# Altium PCB MiniPC.PcbDoc (part 21 of 24)
Units mm, origin at the board's own origin, x right, y up, seen from the top; angles counter-clockwise.
Board outline 175 x 155 mm, 16 copper layers (1_Top, 2_int1_(gnd), 3_int2_(power), 4_int3_(gnd), 5_int4_(sign), 6_int5_(power), 7_int6_(sign), 8_int7_(power), 9_int8_(gnd), 10_int9_(sign), 11_int10_(gnd), 12_int11_(sign), 13_int12_(gnd), 14_int13_(power), 15_int14_(gnd), 16_Bottom), stack 2.008 mm thick; 1046 components, 837 nets, 6010 pads, 4009 vias.
Unrouted connection lines stored in the file: 564.
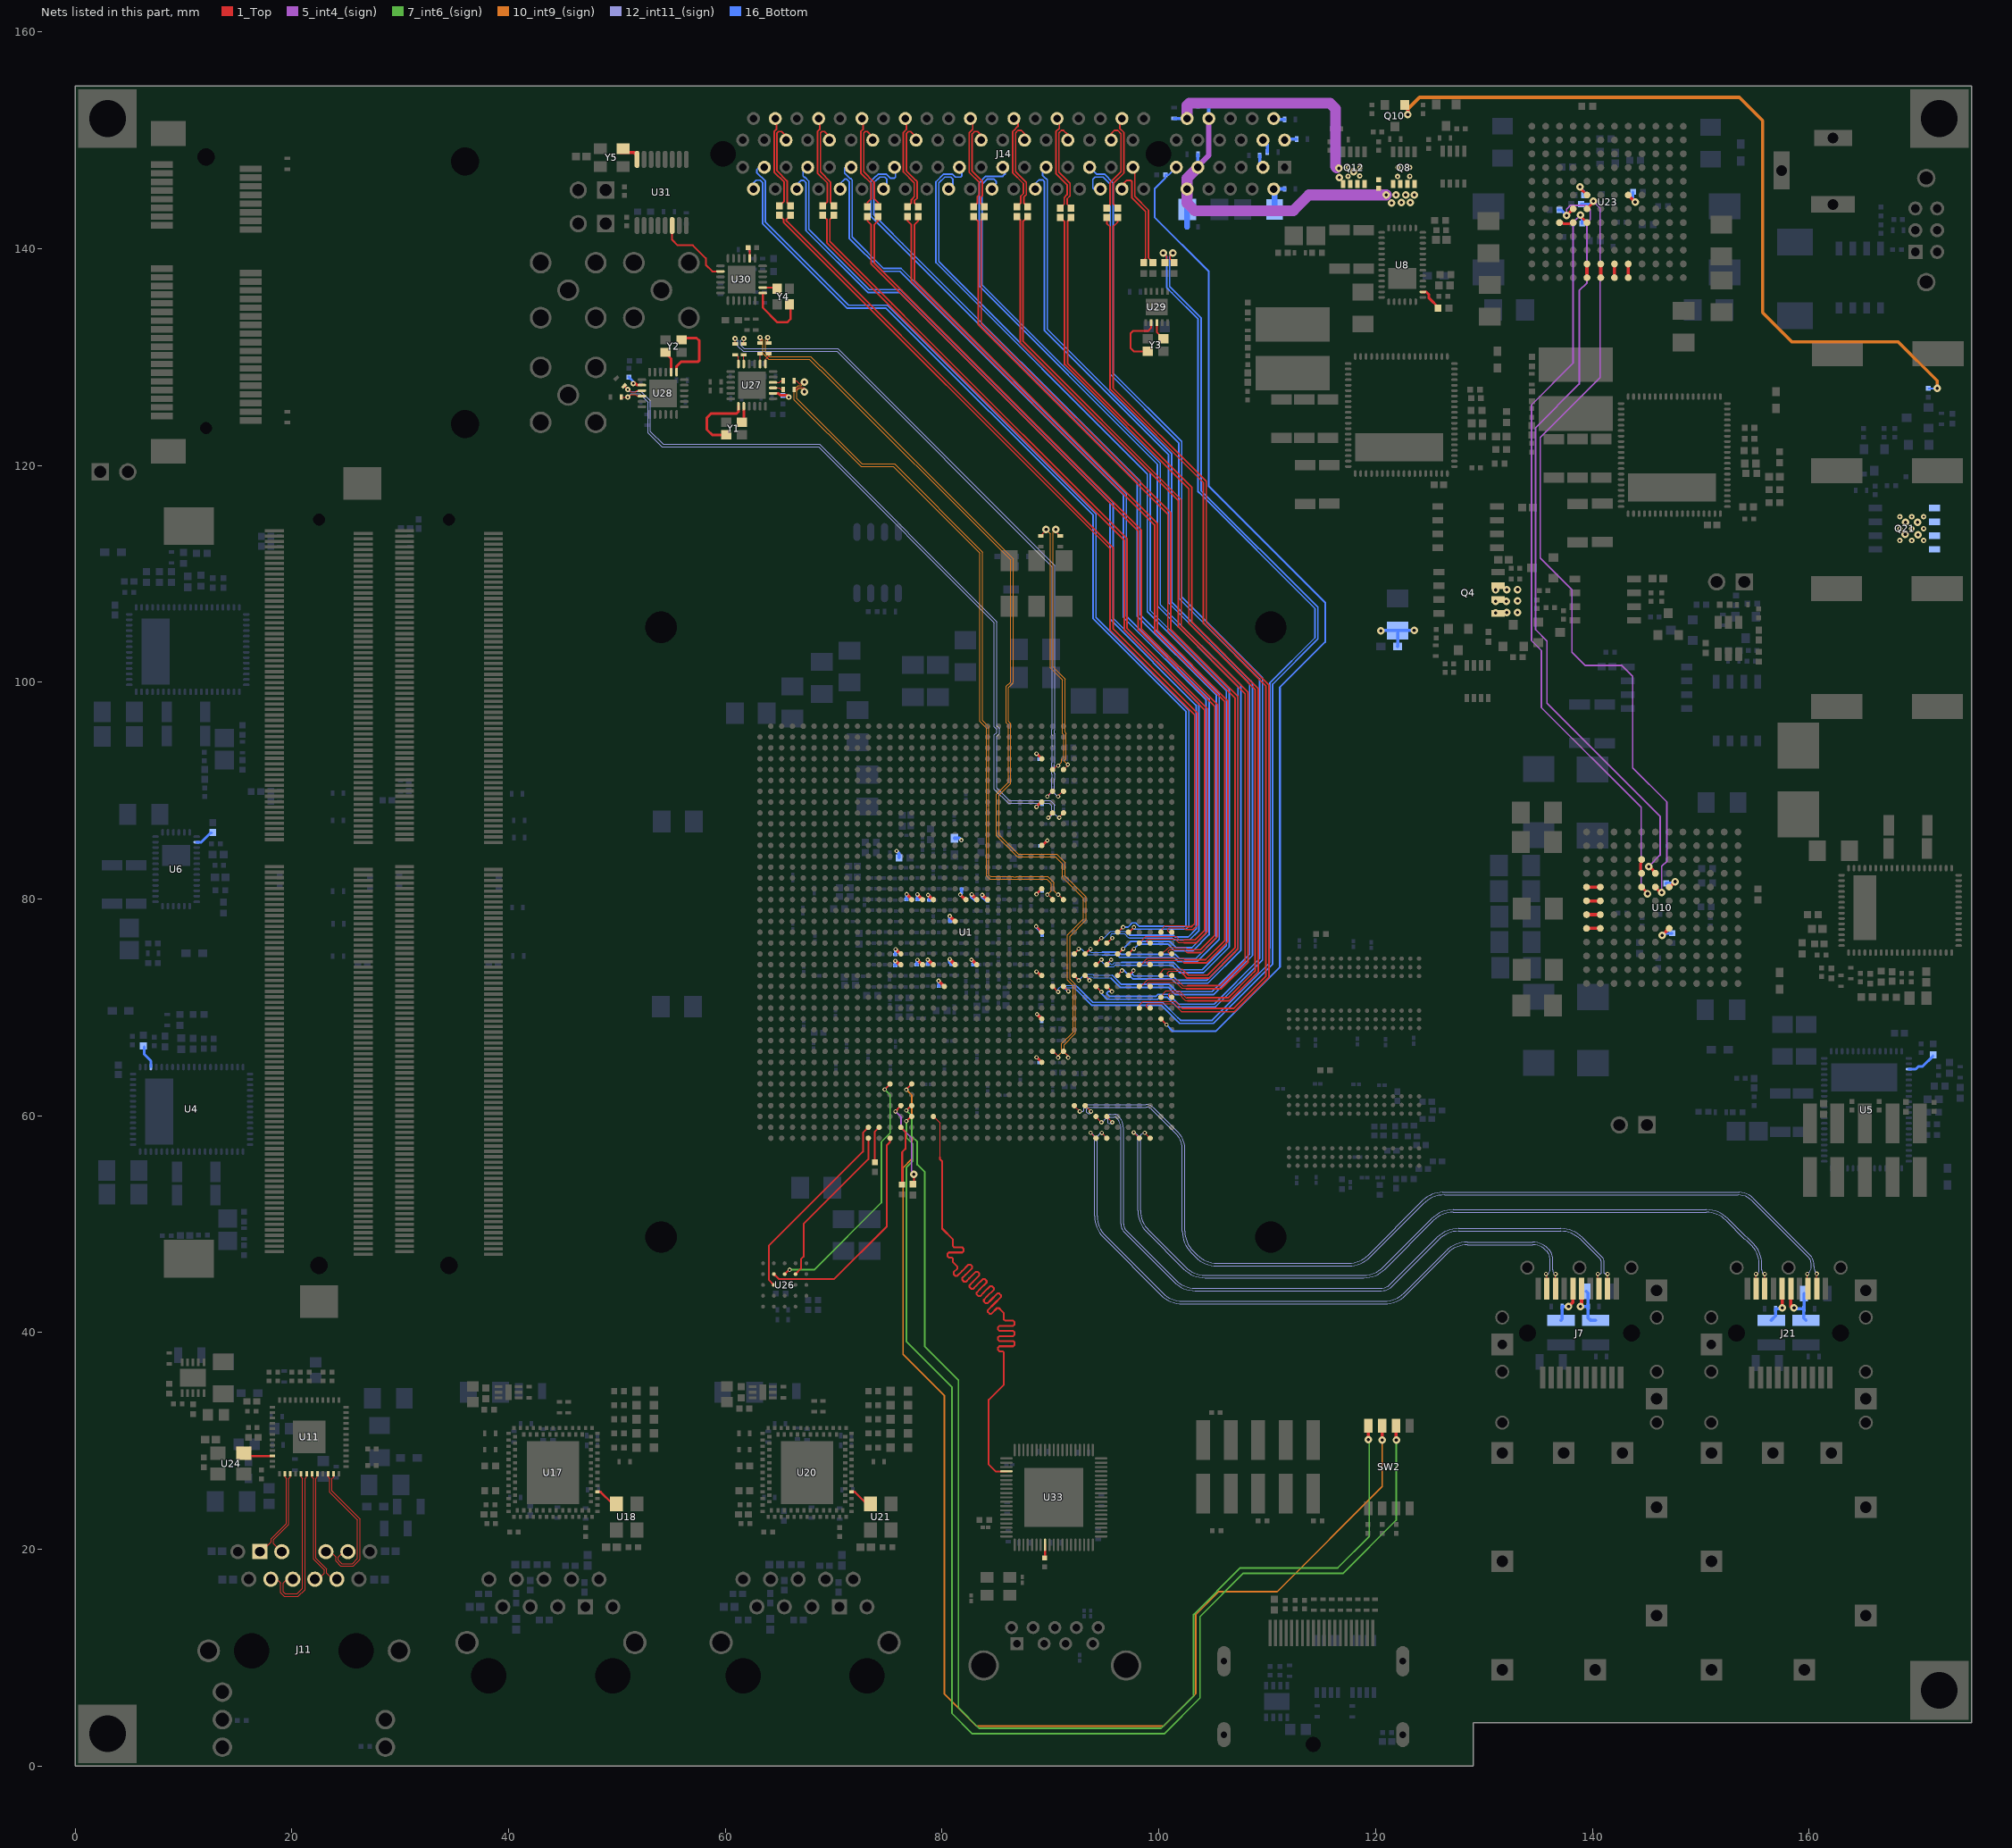
[diagram p33: the nets of this part, all layers, seen from the top]

## Via types
v1: diameter 0.4, hole 0.2, 1_Top to 16_Bottom, tented both sides, 1658 vias
v2: diameter 0.5, hole 0.2, 1_Top to 16_Bottom, tented both sides, 1014 vias
v3: diameter 0.7, hole 0.3, 1_Top to 16_Bottom, tented both sides, 915 vias
v4: diameter 0.6, hole 0.2, 1_Top to 16_Bottom, tented both sides, 278 vias
v5: diameter 0.4, hole 0.2, 1_Top to 16_Bottom, 93 vias
v6: diameter 0.4/0/0/0/0/0/0/0/0/0/0/0/0/0/0/0.4 (per signal layer), hole 0.2, 1_Top to 16_Bottom, tented both sides, 18 vias
v7: diameter 0.4/0/0/0/0/0/0/0/0/0/0/0.4/0.4/0.4/0.4/0.4 (per signal layer), hole 0.2, 1_Top to 16_Bottom, tented both sides, 16 vias
v8: diameter 0.5, hole 0.254, 1_Top to 16_Bottom, tented both sides, 15 vias
v9: diameter 0.5, hole 0.2, 1_Top to 16_Bottom, 2 vias

## Nets (pads, with @x,y where several pads share a name; then routed paths per layer and width w, separated by ;. In a path a pad name is that pad's centre, name@x,y a point inside that pad or via, vN(x,y) a via of type N, cw(c..) or ccw(c..) an arc to the next point about the centre after c; other vN are vias at no path point) (continued)
NetR323_2: R323.2 U1.AT14 | length 8.2
  1_Top w0.17: v1(75.7,60.4) 75.9,60.6 75.9,60.645 U1.AT14@76.194,60.939 ; R323.2@77.3,53.7 77.4,53.8 v3(77.4,54.6)
  5_int4_(sign) w0.15: v1(75.7,60.4) 76.2,59.9 76.2,58.933 77.175,57.958 77.175,54.925 77.4,54.7 v3(77.4,54.6)
NetR324_2: R324.2 U1.AV12 | length 3.5
  1_Top w0.17: R324.2@73.825,55.625 73.769,55.681 73.769,58.514 U1.AV12@74.194,58.939
NetR325_2: R325.2 U1.AV14 | length 5.6
  1_Top w0.17: U1.AV14@76.194,58.939 76.619,58.514 76.619,56.949 76.605,56.949 76.315,56.659 76.315,53.665 R325.2@76.3,53.65
NetR333_2: R333.2 U27.8 | length 2.2
  1_Top w0.25: U27.8@64.4,126.65 64.891,126.65 65.076,126.465 65.685,126.465 v2(65.85,126.3)
  16_Bottom w0.25: R333.2@65.3,126.45 65.7,126.45 v2(65.85,126.3)
NetR334_2: R334.2 U28.8 | length 1.6
  1_Top w0.25: v2(51.5,127.55) 51.6,127.65 51.85,127.4 U28.8@52.3,127.4
  16_Bottom w0.25: R334.2@51.1,128.15 51.5,127.75 v2@51.5,127.65
NetR339_2: R339.2 U30.8 | length 1.1
  1_Top w0.17: R339.2@62.1,140.1 62.245,139.955 U30.8@62.245,139.1
NetR342_1: R342.1 U33.27 | length 1.2
  1_Top w0.2: R342.1@89.5,19.225 U33.27@89.5,20.425
NetSW2_2: SW2.2 U1.AU15 | length 120.6
  1_Top w0.17: v1(76.7,59.5) 77.139,59.939 U1.AU15@77.194,59.939
  1_Top w0.3: SW2.2@121.87,31.42 121.87,30.13 v3(121.9,30.1)
  7_int6_(sign) w0.15: v1(76.7,59.5) 76.7,58 77.3,57.4 77.3,55.829 76.7,55.229 76.7,39.2 80.9,35 80.9,4.9 82.8,3 100.5,3 103.8,6.3 103.8,13.8 107.8,17.8 117,17.8 121.9,22.7 v3(121.9,30.1)
NetSW2_3: SW2.3 U1.AP15 | length 119.3
  1_Top w0.17: v1(76.7,62.4) 76.7,62.445 U1.AP15@77.194,62.939
  1_Top w0.3: v3(120.6,30.1) SW2.3@120.6,31.42
  10_int9_(sign) w0.15: v1(76.7,62.4) 76.733,62.4 77.194,61.939 77.194,55.994 76.4,55.2 76.4,38 80.2,34.2 80.2,6.7 83.2,3.7 100.4,3.7 103.4,6.7 103.4,14 105.5,16.1 110.9,16.1 120.6,25.8 v3(120.6,30.1)
NetSW2_4: SW2.4 U1.AT15 | length 118.4
  1_Top w0.17: v1(76.7,60.5) 77.139,60.939 U1.AT15@77.194,60.939
  1_Top w0.3: v3(119.33,30.13) SW2.4@119.33,31.42
  7_int6_(sign) w0.15: v1(76.7,60.5) 77.2,60 77.2,58.1 77.7,57.6 77.7,55.5 78.4,54.8 78.4,38.7 81.5,35.6 81.5,5.4 83.4,3.5 100.2,3.5 103.2,6.5 103.2,14 107.5,18.3 116.5,18.3 119.4,21.2 119.4,30.06 v3(119.33,30.13)
NetU1_AP13: U1.AP13 U26.D3 | length 23.3
  1_Top w0.17: U26.D3@65.475,45.4 65.875,45.8 v1(65.938,45.8) ; v1(74.7,62.425) 75.194,62.919 U1.AP13@75.194,62.939
  7_int6_(sign) w0.15: v1(65.938,45.8) 68.2,45.8 74.4,52 74.4,57.615 75.2,58.415 75.2,61.894 75.194,61.9 75.194,61.931 v1(74.7,62.425)
NetU1_AV11: U1.AV11 U26.C4 | length 18.5
  1_Top w0.17: U26.C4@64.475,44.4 64,44.875 64,48 72.7,56.7 72.7,58.445 U1.AV11@73.194,58.939
NetU1_AW11: U1.AW11 U26.D2 | length 15.3
  1_Top w0.17: U26.D2@66.475,45.4 66.975,45.9 66.975,46.775 67.225,47.025 67.225,50.025 73.194,55.994 U1.AW11@73.194,57.939
NetU1_AW13: U1.AW13 U26.D4 | length 20.9
  1_Top w0.17: U26.D4@64.475,45.4 64.925,44.95 70.05,44.95 74.9,49.8 74.9,57.3 75.194,57.594 U1.AW13@75.194,57.939
NetU10_C5: U10.C5 U10.D5 | length 1.3
  1_Top w0.25: U10.D5@144.535,82.37 144.535,82.579 144.45,82.664 144.45,83.286 144.535,83.371 U10.C5@144.535,83.64
NetU10_E1: U10.E1 U10.E2 | length 1.3
  1_Top w0.3: U10.E1@139.455,81.1 U10.E2@140.725,81.1
NetU10_F1: U10.F1 U10.F2 | length 1.3
  1_Top w0.3: U10.F1@139.455,79.83 U10.F2@140.725,79.83
NetU10_G1: U10.G1 U10.G2 | length 1.3
  1_Top w0.3: U10.G1@139.455,78.56 U10.G2@140.725,78.56
NetU10_H1: U10.H1 U10.H2 | length 1.3
  1_Top w0.3: U10.H1@139.455,77.29 U10.H2@140.725,77.29
NetU11_46: U11.46 U24.3 | length 2.8
  1_Top w0.2: U24.3@15.7,28.95 15.7,28.75 15.824,28.625 U11.46@18.212,28.625
NetU17_A30: U17.A30 U18.3 | length 2.2
  1_Top w0.2: U17.A30@48.2,25.3 48.5,25.3 49.6,24.2 U18.3@49.9,24.2
NetU20_A30: U20.A30 U21.3 | length 2.2
  1_Top w0.2: U20.A30@71.65,25.3 71.95,25.3 73.05,24.2 U21.3@73.35,24.2
NetU23_C5: U23.C5 U23.D5 | length 1.3
  1_Top w0.25: U23.C5@136.955,142.395 137.224,142.395 137.309,142.31 137.931,142.31 138.016,142.395 U23.D5@138.225,142.395
NetU23_E1: U23.E1 U23.E2 | length 1.3
  1_Top w0.3: U23.E1@139.495,137.315 U23.E2@139.495,138.585
NetU23_F1: U23.F1 U23.F2 | length 1.3
  1_Top w0.3: U23.F1@140.765,137.315 U23.F2@140.765,138.585
NetU23_G1: U23.G1 U23.G2 | length 1.3
  1_Top w0.3: U23.G1@142.035,137.315 U23.G2@142.035,138.585
NetU23_H1: U23.H1 U23.H2 | length 1.3
  1_Top w0.3: U23.H1@143.305,137.315 U23.H2@143.305,138.585
NetU27_1: U27.1 Y1.1 | length 6.4
  1_Top w0.25: Y1.1@59.75,122.8 58.8,122.8 58.3,123.3 58.3,124.4 58.7,124.8 61.05,124.8 61.2,124.95 U27.1@61.2,125.45
NetU27_2: U27.2 Y1.3 | length 1.4
  1_Top w0.25: Y1.3@61.65,124.1 61.7,124.15 U27.2@61.7,125.45
NetU28_1: U28.1 Y2.1 | length 6.3
  1_Top w0.25: U28.1@55.5,128.6 55.5,129.15 55.9,129.55 57.45,129.55 57.6,129.7 57.6,131.5 57.35,131.75 Y2.1@56.1,131.75
NetU28_2: U28.2 Y2.3 | length 2
  1_Top w0.25: Y2.3@54.5,130.35 55,129.85 U28.2@55,128.6
NetU29_2: U29.2 Y3.3 | length 5.7
  1_Top w0.17: Y3.3@98.975,130.525 97.675,130.525 97.4,130.8 97.4,132.2 97.6,132.4 99,132.4 99.3,132.7 U29.2@99.3,133.175
NetU29_3: U29.3 Y3.1 | length 1.8
  1_Top w0.17: U29.3@99.8,133.175 99.8,132.3 Y3.1@100.425,131.675
NetU30_1: U30.1 Y4.1 | length 5.8
  1_Top w0.2: U30.1@63.445,135.9 63.445,134.562 64.807,133.2 65.7,133.2 66,133.5 Y4.1@66,134.7
NetU30_2: U30.2 Y4.3 | length 1.4
  1_Top w0.2: U30.2@63.445,136.4 64.7,136.4 Y4.3@64.8,136.3
NetU30_14: U30.14 U31.14 | length 7.3
  1_Top w0.17: U31.14@55.095,142.126 55.095,140.805 55.6,140.3 57,140.3 58.2,139.1 58.2,138.5 58.8,137.9 U30.14@59.545,137.9
NetU31_8: U31.8 Y5.3 | length 2
  1_Top w0.3: Y5.3@50.321,148.875 51.55,148.875 51.845,148.58 U31.8@51.845,148.226
PCIE_3V3: Q8.5 Q8.6 Q8.7 Q8.8 R18.2
  other v2: 122.025,146.65 123.15,146.675 122.05,147.482 123.15,147.482
PCIE_12V: C500.2 C501.2 C502.2 C503.2 C504.2 C505.2 J14.A2 J14.A3 J14.B1 J14.B2 J14.B3 Q21.5 Q21.6 Q21.7 Q21.8 | length 7.7
  16_Bottom w0.3: C501.2@109.3,148.6 109.3,147.8 J14.A3@109.6,147.5 ; J14.B3@109.6,150 110,149.6 C502.2@110,148.9 ; C500.2@110.6,143.675 C500.2@110.675,143.6 ; J14.A2@110.6,145.5 C504.2@111.6,145.5 ; J14.B2@110.6,152 110.7,151.9 C505.2@111.6,151.9 ; J14.B1@111.6,150 111.7,150.1 C503.2@112.7,150.1
  16_Bottom w0.5: J14.A2@110.6,145.5 110.675,145.425 C500.2@110.675,143.6
  other v2: 168.36,113.065 169.46,113.065 170.56,113.065 168.36,114.165 169.46,114.165 170.56,114.165 168.36,115.265 169.46,115.265 170.56,115.265
  other v3: 170.03,113.59 168.86,113.63 168.89,114.74 170.01,114.74
PCIE_AUX3V3: C483.2 J14.B10 Q12.5 Q12.6 Q12.7 Q12.8 | length 21.9
  5_int4_(sign) w1: J14.B10@102.6,152 102.6,153.2 102.8,153.4 115.8,153.4 116.3,152.9 116.3,147.55 v3@116.4,147.45
  16_Bottom w0.3: C483.2@101.4,152 J14.B10@102.6,152
  other v2: 117.45,146.675 118.525,146.7 117.45,147.482 118.55,147.482
  other v3: 116.65,146.56 117.97,147.1 116.62,147.4
PCIE_DC_3V3: C506.2 C507.2 C508.2 C509.2 J14.A9 J14.A10 J14.B8 R18.1 | length 33.9
  1_Top w0.25: R18.1@120.27,145.55 R18.1@120.37,145.55
  5_int4_(sign) w0.5: J14.A9@103.6,147.5 103.6,147.6 104.6,148.6 J14.B8@104.6,152
  5_int4_(sign) w1: J14.A9@103.6,147.5 102.6,146.5 J14.A10@102.6,145.5 102.6,144.2 103.3,143.5 112.4,143.5 113.85,144.95 v3(120.97,144.95)
  16_Bottom w0.3: J14.A9@103.6,147.5 C507.2@103.6,148.7 ; J14.B8@104.6,152 C506.2@104.6,153.2
  16_Bottom w0.5: C508.2@102.6,142 102.6,143.575 C509.2@102.625,143.6 ; C509.2@102.6,143.625 J14.A10@102.6,145.5
  other v3: 121.46,144.22 122.36,144.25 123.21,144.25 121.87,144.95 122.77,144.95 123.57,144.95
PCIE_EN: Q10.1 R139.1 | length 73.5
  1_Top w0.25: Q10.1@122.685,153.25 122.97,152.965 v3(122.97,152.35)
  10_int9_(sign) w0.3: v3(122.97,152.35) 122.97,152.87 124.05,153.95 153.55,153.95 155.7,151.8 155.7,134.1 158.4,131.4 168.2,131.4 171.8,127.8 v3(171.8,127.1)
  16_Bottom w0.17: R139.1@171,127.1 v3(171.8,127.1)
PCIE_PERSTN: J14.A11 R332.1 U1.AH38 | length 97
  1_Top w0.17: U1.AH38@100.194,68.939 100.194,68.906 v1(100.7,68.4)
  16_Bottom w0.17: v1(100.7,68.4) 101.3,67.8 105.245,67.8 111.17,73.725 111.17,74.715 111.165,74.72 111.165,75.08 111.17,75.085 111.17,99.541 115.34,103.711 115.34,107.36 104.6,118.1 104.6,137.9 99.6,142.9 99.6,145.5 100.6,146.5 R332.1@100.6,146.8 100.9,146.8 J14.A11@101.6,147.5
PCIE_REFCLK_QR0_N: R336.2 U1.AE28 | length 98.3
  1_Top w0.15: U1.AE28@90.194,71.939 v6(90.7,71.433) ; v3(100.4,139.6) 100.7,139.3 100.7,138.85 R336.2@100.55,138.7
  16_Bottom w0.1: v6(90.7,71.433) 90.7,71.685 91.065,72.05 92.332,72.05 92.503,71.878
  16_Bottom w0.15: 92.503,71.878 93.912,70.47 100.33,70.47 101.755,69.045 101.767,69.045 102.012,68.8 104.915,68.8 110.225,74.11 110.225,75.47 110.23,75.475 110.23,99.93 114.4,104.1 114.4,106.8 103.7,117.5 103.621,117.579 103.621,133.497 101.218,135.9 100.715,136.403 100.715,139.285 v3(100.4,139.6)
PCIE_REFCLK_QR0_P: R335.2 U1.AE29 | length 98.1
  1_Top w0.15: U1.AE29@91.194,71.939 v6(91.65,71.483) ; v3(101.3,139.6) 101.04,139.34 101.04,139.06 R335.2@101.4,138.7
  16_Bottom w0.1: v6(91.65,71.483) 91.518,71.483 91.396,71.605 91.396,71.72 91.506,71.83 92.17,71.83 92.4,71.6
  16_Bottom w0.15: 92.4,71.6 93.8,70.2 100.218,70.2 101.643,68.775 101.655,68.775 101.875,68.555 101.875,68.543 101.888,68.53 105.027,68.53 110.495,73.998 110.495,74.195 110.495,75.358 110.5,75.363 110.5,99.818 114.67,103.988 114.67,106.912 103.891,117.691 103.891,133.609 100.985,136.515 100.985,139.285 v3(101.3,139.6)
PCIE_REFCLK_SYN_N: J14.A14 R338.2 | length 9.7
  1_Top w0.15: J14.A14@96.6,145.5 96.6,145.867 97.033,146.3 97.4,146.3 97.505,146.195 97.505,144.695 97.65,144.55 98.765,143.435 98.765,139.115 98.475,138.825 R338.2@98.35,138.7
PCIE_REFCLK_SYN_P: J14.A13 R337.2 | length 9.6
  1_Top w0.15: J14.A13@97.6,147.5 97.775,147.325 97.775,144.807 99.035,143.547 99.035,139.148 99.192,138.992 99.192,138.958 R337.2@99.45,138.7
PCIE_RX0_N: J14.A17 U1.AE32 | length 98.4
  1_Top w0.15: U1.AE32@94.194,71.939 v6(94.7,71.433)
  16_Bottom w0.15: J14.A17@93.6,147.5 94.23,146.87 94.97,146.87 95.775,146.065 95.775,146.025 95.779,146.021 95.779,145.846 95.775,145.842 95.775,145.158 95.779,145.154 95.779,128.521 102.1,122.2 102.1,107.882 109.565,100.417 109.565,74.383 105.212,70.03 101.688,70.03 101.609,70.109 100.788,70.93 100.042,70.93 99.867,70.755 95.22,70.755 94.7,71.275 v6(94.7,71.433)
PCIE_RX0_P: J14.A16 U1.AE33 | length 98.3
  1_Top w0.15: U1.AE33@95.194,71.939 v6(95.667,71.467)
  16_Bottom w0.15: J14.A16@94.6,145.5 94,145.5 93.9,145.6 93.9,146.4 94.1,146.6 94.859,146.6 95.505,145.954 95.505,145.046 95.509,145.042 95.509,128.409 101.83,122.088 101.83,107.77 109.295,100.305 109.295,74.495 105.1,70.3 101.8,70.3 100.9,71.2 99.93,71.2 99.755,71.025 95.425,71.025 95.215,71.235 95.215,71.37 95.312,71.467 v6(95.667,71.467)
PCIE_RX1_N: J14.A22 U1.AD30 | length 99.4
  1_Top w0.1: U1.AD30@92.194,72.939 U1.AD30@92.239,72.939 ; v6(92.6,72.5) v6@92.6,72.579
  1_Top w0.15: U1.AD30@92.194,72.939 92.554,72.579 v6@92.6,72.579
  16_Bottom w0.1: v6(92.6,72.5) 93.15,73.05 93.926,73.05 94.006,72.97 95.7,72.97
  16_Bottom w0.15: J14.A22@88.6,145.5 88.6,146 88.93,146.33 89.3,146.33 89.43,146.2 89.43,142.54 89.43,139.918 89.43,134.3 89.43,132.458 100.9,120.988 100.9,107.315 108.23,99.985 108.23,99.97 108.365,99.835 108.365,74.915 104.9,71.45 101.65,71.45 100.975,72.125 96.545,72.125 95.7,72.97
PCIE_RX1_P: J14.A21 U1.AD31 | length 99.3
  1_Top w0.15: U1.AD31@93.194,72.939 93.6,72.533 v6(93.6,72.5)
  16_Bottom w0.1: v6(93.6,72.5) 93.531,72.5 93.391,72.64 93.391,72.735 93.486,72.83 93.835,72.83 93.94,72.725 95.563,72.725 95.588,72.7
  16_Bottom w0.15: J14.A21@89.6,147.5 89.275,147.175 89.275,146.737 89.542,146.47 89.586,146.47 89.7,146.356 89.7,132.57 101.17,121.1 101.17,107.427 108.5,100.097 108.5,100.082 108.635,99.947 108.635,74.803 105.012,71.18 101.538,71.18 101.459,71.259 100.863,71.855 96.433,71.855 95.588,72.7
PCIE_RX2_N: J14.A26 U1.AD34 | length 96.3
  1_Top w0.15: U1.AD34@96.194,72.939 96.194,72.994 v6(96.6,73.4)
  16_Bottom w0.15: J14.A26@84.6,145.5 84.6,145.6 85,146 85,146.2 84.8,146.4 84.141,146.4 83.695,145.954 83.695,136.647 100.13,120.212 100.13,107.152 107.57,99.712 107.57,75.288 104.512,72.23 101.573,72.23 101.173,72.63 97.575,72.63 96.805,73.4 v6(96.6,73.4)
PCIE_RX2_P: J14.A25 U1.AD35 | length 96.3
  1_Top w0.15: U1.AD35@97.194,72.939 v6(97.655,73.4)
  16_Bottom w0.15: J14.A25@85.6,147.5 85.8,147.3 85.8,146.875 85.595,146.67 84.03,146.67 83.425,146.065 83.425,136.535 99.86,120.1 99.86,107.04 107.3,99.6 107.3,75.4 104.4,72.5 101.685,72.5 101.285,72.9 97.695,72.9 97.555,73.04 97.555,73.4 v6(97.655,73.4)
PCIE_RX3_N: J14.A30 U1.AC32 | length 98.4
  1_Top w0.15: U1.AC32@94.194,73.939 94.239,73.939 v6(94.7,74.4)
  16_Bottom w0.1: v6(94.7,74.4) 94.7,74.265 95.204,73.761 95.831,73.761 95.975,73.905 96.54,73.905 96.565,73.88
  16_Bottom w0.15: J14.A30@80.6,145.5 81,145.9 81,146.4 80.8,146.6 80.249,146.6 79.695,146.046 79.695,138.823 99.2,119.318 99.2,106.613 106.49,99.323 106.49,75.59 104.1,73.2 101.918,73.2 101.618,73.5 101.238,73.88 96.565,73.88
PCIE_RX3_P: J14.A29 U1.AC33 | length 98.9
  1_Top w0.1: v6@95.6,74.345 v6(95.6,74.4)
  1_Top w0.15: U1.AC33@95.194,73.939 95.194,73.994 v6(95.6,74.4)
  16_Bottom w0.1: v6(95.6,74.4) 95.445,74.245 95.445,74.116 95.58,73.981 95.739,73.981 95.884,74.125 96.525,74.125 96.55,74.15
  16_Bottom w0.15: J14.A29@81.6,147 J14.A29@81.6,147.5 81.825,147.275 81.825,146.725 81.7,146.6 81.2,146.6 80.93,146.87 80.137,146.87 79.425,146.158 79.425,144.58 79.425,138.711 98.93,119.206 98.93,106.501 106.22,99.211 106.22,75.702 103.988,73.47 102.03,73.47 101.35,74.15 96.55,74.15
PCIE_RX4_N: J14.A36 U1.AB30 | length 100.5
  1_Top w0.1: v6@92.6,75.345 v6(92.6,75.4)
  1_Top w0.15: U1.AB30@92.194,74.939 v6@92.6,75.345
  16_Bottom w0.1: v6(92.6,75.4) 92.845,75.4 93.39,74.855 94.755,74.855 94.78,74.83
  16_Bottom w0.15: J14.A36@74.6,145.5 74.9,145.8 74.9,146.4 74.7,146.6 74.249,146.6 74.054,146.405 74.005,146.405 73.7,146.1 73.7,143.1 74.708,142.092 76.335,140.465 98.1,118.7 98.27,118.53 98.27,106.228 105.56,98.938 105.56,76.278 103.591,74.309 103.512,74.23 101.788,74.23 101.609,74.409 101.388,74.63 96.37,74.63 96.17,74.83 94.78,74.83
PCIE_RX4_P: J14.A35 U1.AB31 | length 100.7
  1_Top w0.1: v6@93.655,75.4 v6(93.7,75.4)
  1_Top w0.15: U1.AB31@93.194,74.939 v6@93.655,75.4
  16_Bottom w0.1: v6(93.7,75.4) 93.625,75.325 93.625,75.18 93.73,75.075 94.755,75.075 94.78,75.1
  16_Bottom w0.15: J14.A35@75.6,147.2 J14.A35@75.6,147.5 75.7,147.4 75.7,146.6 75.6,146.5 75.2,146.5 74.83,146.87 74.137,146.87 73.942,146.675 73.893,146.675 73.43,146.212 73.43,142.988 74.517,141.902 98,118.418 98,106.116 105.29,98.826 105.29,76.39 103.4,74.5 101.9,74.5 101.5,74.9 96.512,74.9 96.312,75.1 94.78,75.1
PCIE_RX5_N: J14.A40 U1.AB34 | length 95
  1_Top w0.1: v6@96.655,75.4 v6(96.7,75.4)
  1_Top w0.15: U1.AB34@96.194,74.939 96.239,74.939 v6(96.7,75.4)
  16_Bottom w0.15: J14.A40@70.6,145.5 70.6,146 71,146.4 71.2,146.4 71.43,146.17 71.43,144.125 71.43,142.185 71.43,140.958 74.488,137.9 76.1,137.9 96.73,117.27 96.73,105.97 104.36,98.34 104.36,76.83 103.03,75.5 101.6,75.5 101,76.1 97.4,76.1 v6(96.7,75.4)
PCIE_RX5_P: J14.A39 U1.AB35 | length 94.9
  1_Top w0.1: v6@97.655,75.4 v6(97.7,75.4)
  1_Top w0.15: U1.AB35@97.194,74.939 v6@97.655,75.4
  16_Bottom w0.15: J14.A39@71.6,147.5 71.075,147.5 71,147.425 71,146.982 71.542,146.44 71.586,146.44 71.7,146.326 71.7,144.125 71.7,142.185 71.7,141.07 74.6,138.17 76.212,138.17 97,117.382 97,106.082 104.63,98.452 104.63,76.718 103.13,75.218 101.467,75.218 100.855,75.83 98.13,75.83 v6(97.7,75.4)
PCIE_RX6_N: J14.A44 U1.AA32 | length 97.2
  1_Top w0.15: U1.AA32@94.194,75.939 94.239,75.939 v6(94.7,76.4)
  16_Bottom w0.1: v6(94.7,76.4) 94.941,76.4 95.556,77.015 96.94,77.015 97.285,76.67
  16_Bottom w0.15: J14.A44@66.6,145.5 66.6,145.9 67,146.3 67.23,146.3 67.43,146.1 67.43,144.045 67.43,141.76 67.43,141.673 73.153,135.95 76.05,135.95 95.5,116.5 95.5,105.8 103.43,97.87 103.43,77.215 102.715,76.5 101.5,76.5 101.33,76.67 97.285,76.67
PCIE_RX6_P: J14.A43 U1.AA33 | length 97.3
  1_Top w0.15: U1.AA33@95.194,75.939 95.239,75.939 v6(95.7,76.4)
  16_Bottom w0.1: v6(95.7,76.4) 95.59,76.51 95.59,76.737 95.648,76.795 96.849,76.795 97.04,76.604 97.04,76.569 97.184,76.425 97.275,76.425 97.3,76.4
  16_Bottom w0.15: J14.A43@67.6,147.5 67.4,147.3 67.375,147.3 67.175,147.1 67.175,146.7 67.305,146.57 67.342,146.57 67.4,146.512 67.6,146.312 67.7,146.212 67.7,144.045 67.7,141.97 67.7,141.785 73.265,136.22 76.162,136.22 76.241,136.141 95.77,116.612 95.77,105.912 103.7,97.982 103.7,77.103 102.827,76.23 101.388,76.23 101.318,76.3 101.218,76.4 99.1,76.4 97.3,76.4
PCIE_RX7_N: J14.A48 U1.Y34 | length 95.2
  1_Top w0.1: v6@96.655,77.4 v6(96.7,77.4)
  1_Top w0.15: U1.Y34@96.194,76.939 v6@96.655,77.4
  16_Bottom w0.15: J14.A48@62.6,145.5 62.6,146.07 62.84,146.31 63.22,146.31 63.43,146.1 63.43,142.328 71.258,134.5 74.83,134.5 93.93,115.4 93.93,105.87 102.5,97.3 102.5,77.6 102.385,77.485 98.174,77.485 97.864,77.795 97.536,77.795 97.141,77.4 v6(96.7,77.4)
PCIE_RX7_P: J14.A47 U1.Y35 | length 95.2
  1_Top w0.15: U1.Y35@97.194,76.939 97.239,76.939 v6(97.7,77.4)
  16_Bottom w0.15: J14.A47@63.6,147.5 63.125,147.5 62.9,147.275 62.9,147.012 63.7,146.212 63.7,142.44 71.37,134.77 74.942,134.77 94.2,115.512 94.2,105.982 102.77,97.412 102.77,77.488 102.497,77.215 97.75,77.215 97.7,77.265 v6(97.7,77.4)
PCIE_TX0_C_N: C485.2 J14.B15 | length 9.1
  1_Top w0.15: C485.2@95.2,143.74 95.2,143.758 95.5,144.058 95.5,146.082 95.6,146.182 96.5,147.082 96.5,150.6 96.2,150.9 95.9,150.9 95.6,150.6 J14.B15@95.6,150
PCIE_TX0_C_P: C484.2 J14.B14 | length 9.1
  1_Top w0.15: C484.2@96.2,143.74 95.77,144.17 95.77,145.97 96.77,146.97 96.77,150.712 96.391,151.091 96.391,151.791 J14.B14@96.6,152
PCIE_TX0_N: C485.1 U1.AG36 | length 89.7
  1_Top w0.1: U1.AG36@98.194,69.939 98.194,70.224 98.519,70.549 101.51,70.549 102.16,69.9
  1_Top w0.15: C485.1@95.2,142.86 95.2,142.3 95.5,142 95.5,127.018 104.1,118.418 104.1,105.425 109.88,99.645 109.88,72.892 106.888,69.9 102.16,69.9
PCIE_TX0_P: C484.1 U1.AG37 | length 89.9
  1_Top w0.1: U1.AG37@99.194,70.094 U1.AG37@99.194,69.939 98.967,69.939 98.837,70.07 98.837,70.205 98.961,70.329 101.355,70.329 102.085,69.6
  1_Top w0.15: C484.1@96.2,142.86 96.2,142.455 95.77,142.025 95.77,127.13 104.37,118.53 104.37,105.537 110.15,99.757 110.15,72.78 106.97,69.6 102.085,69.6
PCIE_TX1_C_N: C487.2 J14.B20 | length 9.2
  1_Top w0.15: J14.B20@90.6,152 90.809,151.791 90.809,151.091 90.5,150.782 90.5,146.93 91.53,145.9 91.53,144.977 91.265,144.712 91.265,144.105 C487.2@90.9,143.74
PCIE_TX1_C_P: C486.2 J14.B19 | length 9.2
  1_Top w0.15: J14.B19@91.6,150 91.6,150.5 91.2,150.9 91,150.9 90.77,150.67 90.77,147.042 91.8,146.012 91.8,144.865 91.535,144.6 91.535,144.105 C486.2@91.9,143.74
PCIE_TX1_N: C487.1 U1.AF38 | length 87.2
  1_Top w0.1: U1.AF38@100.194,70.939 100.194,71.055 100.679,71.54 101.865,71.54 102.514,70.891 102.6,70.891
  1_Top w0.15: C487.1@90.9,142.86 91.3,142.46 91.3,129.318 102.765,117.853 102.765,105.444 108.89,99.319 108.89,73.39 108.5,73 106.391,70.891 102.6,70.891
PCIE_TX1_P: C486.1 U1.AF39 | length 87.2
  1_Top w0.1: U1.AF39@101.194,70.939 101.011,70.939 100.91,71.04 100.91,71.21 101.02,71.32 101.774,71.32 102.448,70.646 102.619,70.646 102.644,70.621
  1_Top w0.15: C486.1@91.9,142.86 91.57,142.53 91.57,129.43 103.035,117.965 103.035,105.556 109.16,99.431 109.16,73.278 106.582,70.7 106.503,70.621 102.644,70.621
PCIE_TX2_C_N: C489.2 J14.B24 | length 9.2
  1_Top w0.15: J14.B24@86.634,152 86.995,151.639 86.995,151.277 86.6,150.882 86.505,150.787 86.505,146.995 87.5,146 87.5,145.082 87.265,144.847 87.265,144.205 C489.2@86.9,143.84
PCIE_TX2_C_P: C488.2 J14.B23 | length 9.1
  1_Top w0.15: J14.B23@87.6,150 87.6,150.6 87.3,150.9 87,150.9 86.775,150.675 86.775,147.107 87.77,146.112 87.77,144.97 87.7,144.9 87.535,144.735 87.535,144.205 C488.2@87.9,143.84
PCIE_TX2_N: C489.1 U1.AE36 | length 88.6
  1_Top w0.1: U1.AE36@98.194,71.939 98.359,71.939 98.969,72.549 101.662,72.549 102.211,72 102.646,72
  1_Top w0.15: C489.1@86.9,142.96 87.2,142.66 87.2,140.411 87.2,137.871 87.2,134.088 87.2,131.318 101.8,116.718 101.8,105.094 107.96,98.934 107.96,74.295 105.665,72 102.646,72
PCIE_TX2_P: C488.1 U1.AE37 | length 88.6
  1_Top w0.1: U1.AE37@99.194,71.939 99.016,71.939 98.954,72.001 98.954,72.22 99.064,72.329 101.571,72.329 102.12,71.78 102.485,71.78 102.535,71.73
  1_Top w0.15: C488.1@87.9,142.96 87.47,142.53 87.47,140.411 87.47,137.871 87.47,131.43 102.07,116.83 102.07,105.206 108.23,99.046 108.23,74.183 105.777,71.73 102.535,71.73
PCIE_TX3_C_N: C491.2 J14.B28 | length 9
  1_Top w0.15: J14.B28@82.6,152 82.83,151.77 82.83,151.012 82.5,150.682 82.5,147.03 83.43,146.1 83.43,144.977 83.265,144.812 83.265,144.205 C491.2@82.9,143.84
PCIE_TX3_C_P: C490.2 J14.B27 | length 8.9
  1_Top w0.15: J14.B27@83.6,150 83.6,150.485 83.285,150.8 83,150.8 82.77,150.57 82.77,147.142 83.7,146.212 83.7,144.865 83.535,144.7 83.535,144.205 C490.2@83.9,143.84
PCIE_TX3_N: C491.1 U1.AD38 | length 86
  1_Top w0.1: U1.AD38@100.194,72.939 100.194,73.279 100.464,73.549 102.132,73.549 102.327,73.354
  1_Top w0.15: C491.1@82.9,142.96 83.33,142.53 83.33,132.988 100.83,115.488 100.83,104.749 107.02,98.559 107.02,75.502 104.497,72.979 104.079,72.979 104.07,72.97 102.712,72.97 102.327,73.354
PCIE_TX3_P: C490.1 U1.AD39 | length 86
  1_Top w0.1: U1.AD39@101.194,72.939 100.925,72.939 100.797,73.068 100.797,73.185 100.941,73.329 101.971,73.329 102.216,73.084
  1_Top w0.15: C490.1@83.9,142.96 83.6,142.66 83.6,133.1 101.1,115.6 101.1,104.861 107.29,98.671 107.29,75.39 106.87,74.97 104.609,72.709 104.191,72.709 104.182,72.7 102.6,72.7 102.216,73.084
PCIE_TX4_C_N: C493.2 J14.B34 | length 9
  1_Top w0.15: J14.B34@76.6,152 76.709,151.891 76.709,150.991 76.43,150.712 76.43,147.07 77.43,146.07 77.43,144.777 77.165,144.512 77.165,144.205 C493.2@76.8,143.84
  16_Bottom w0.1: J14.B34@76.58,151.98 J14.B34@76.6,152
PCIE_TX4_C_P: C492.2 J14.B33 | length 8.9
  1_Top w0.15: J14.B33@77.6,150 77.6,150.3 77.1,150.8 76.9,150.8 76.7,150.6 76.7,147.182 77.6,146.282 77.7,146.182 77.7,144.665 77.435,144.4 77.435,144.205 C492.2@77.8,143.84
PCIE_TX4_N: C493.1 U1.AC36 | length 87.9
  1_Top w0.1: U1.AC36@98.194,73.939 98.342,73.939 98.952,74.549 102.251,74.549 102.378,74.422
  1_Top w0.15: C493.1@76.8,142.96 76.8,142.555 77.165,142.19 77.165,141.453 77.165,139.36 77.165,137.353 77.165,136.953 99.6,114.518 99.6,104.664 106.09,98.174 106.09,76.19 104.299,74.399 102.386,74.399 102.371,74.415
PCIE_TX4_P: C492.1 U1.AC37 | length 87.9
  1_Top w0.1: U1.AC37@99.194,73.939 99.009,73.939 98.908,74.041 98.908,74.193 99.044,74.329 102.106,74.329 102.318,74.117
  1_Top w0.15: C492.1@77.8,142.96 77.8,142.555 77.435,142.19 77.435,137.065 99.87,114.63 99.87,104.776 106.36,98.286 106.36,76.078 104.399,74.117 102.318,74.117
PCIE_TX5_C_N: C495.2 J14.B38 | length 8.8
  1_Top w0.15: J14.B38@72.6,152 72.709,151.891 72.709,150.991 72.5,150.782 72.5,146.965 73.465,146 73.465,144.61 73.1,144.245 C495.2@73.1,143.84
PCIE_TX5_C_P: C494.2 J14.B37 | length 8.8
  1_Top w0.15: J14.B37@73.6,150 73.6,150.3 73.1,150.8 72.9,150.8 72.77,150.67 72.77,147.077 73.735,146.112 73.735,144.61 74.1,144.245 C494.2@74.1,143.84
PCIE_TX5_N: C495.1 U1.AB38 | length 85.4
  1_Top w0.1: U1.AB38@100.194,74.939 100.297,74.939 100.899,75.542 102.44,75.542 102.652,75.329
  1_Top w0.15: C495.1@73.1,142.96 73.1,142.555 73.465,142.19 73.465,141.986 73.465,141.707 73.465,139.41 73.465,138.565 98.1,113.93 98.1,104.849 105.16,97.789 105.16,76.66 103.829,75.329 102.652,75.329
PCIE_TX5_P: C494.1 U1.AB39 | length 85.7
  1_Top w0.1: U1.AB39@101.314,75.059 U1.AB39@101.194,74.939 100.991,74.939 100.863,75.067 100.863,75.195 100.99,75.322 102.313,75.322 102.576,75.059 102.659,75.059
  1_Top w0.15: C494.1@74.1,142.96 74.1,142.555 73.735,142.19 73.735,138.677 98.37,114.042 98.37,104.96 105.43,97.9 105.43,76.548 103.941,75.059 102.659,75.059
PCIE_TX6_C_N: C497.2 J14.B42 | length 8.8
  1_Top w0.15: J14.B42@68.6,152 68.709,151.891 68.709,150.991 68.5,150.782 68.5,146.965 69.425,146.04 69.425,144.325 69.04,143.94 C497.2@69,143.94
PCIE_TX6_C_P: C496.2 J14.B41 | length 8.7
  1_Top w0.15: J14.B41@69.6,150 69.6,150.355 69.155,150.8 68.9,150.8 68.77,150.67 68.77,147.077 69.7,146.147 69.7,144.24 C496.2@70,143.94
PCIE_TX6_N: C497.1 U1.AA36 | length 87.3
  1_Top w0.1: U1.AA36@98.194,75.939 98.804,76.549 101.562,76.549 101.911,76.2 102.3,76.2 102.325,76.225
  1_Top w0.15: C497.1@69,143.06 69.365,142.695 69.365,140.535 75.207,134.693 77.505,132.395 90.17,119.73 96.8,113.1 96.8,104.833 104.23,97.403 104.23,77.13 103.325,76.225 102.325,76.225
PCIE_TX6_P: C496.1 U1.AA37 | length 87.4
  1_Top w0.1: U1.AA37@99.194,75.939 99.003,75.939 98.895,76.048 98.895,76.225 98.999,76.329 101.471,76.329 101.82,75.98 102.3,75.98 102.325,75.955
  1_Top w0.15: C496.1@70,143.06 69.635,142.695 69.635,140.647 75.398,134.884 77.696,132.586 97.07,113.212 97.07,104.945 104.5,97.515 104.5,77.018 103.437,75.955 102.325,75.955
PCIE_TX7_C_N: C499.2 J14.B46 | length 8.8
  1_Top w0.15: J14.B46@64.6,152 64.709,151.891 64.709,150.991 64.5,150.782 64.5,147.065 64.505,147.06 64.505,147.046 65.425,146.126 65.425,144.365 C499.2@65,143.94
PCIE_TX7_C_P: C498.2 J14.B45 | length 8.7
  1_Top w0.15: J14.B45@65.6,150 65.6,150.38 65.18,150.8 64.9,150.8 64.77,150.67 64.77,147.177 64.775,147.172 64.775,147.158 65.695,146.238 65.695,144.245 C498.2@66,143.94
PCIE_TX7_N: C499.1 U1.Y38 | length 84.8
  1_Top w0.1: U1.Y38@100.194,76.939 100.194,77.144 100.595,77.545 102.405,77.545 102.5,77.45
  1_Top w0.15: C499.1@65,143.06 65.365,142.695 65.365,142.435 95.5,112.3 95.5,104.8 103.3,97 103.3,77.722 103.028,77.45 102.5,77.45
PCIE_TX7_P: C498.1 U1.Y39 | length 84.9
  1_Top w0.1: U1.Y39@101.194,76.939 100.971,76.939 100.84,77.07 100.84,77.22 100.945,77.325 102.279,77.325 102.399,77.205 102.475,77.205 102.5,77.18
  1_Top w0.15: 65.635,142.712 65.635,142.695 ; C498.1@66,143.06 65.635,142.695 ; 102.5,77.18 103.14,77.18 103.57,77.61 103.57,97.13 95.77,104.93 95.77,112.412 86.862,121.32 65.635,142.547 65.635,142.695
PDEN: R109.2 U8.27 | length 2.3
  1_Top w0.25: U8.27@124.35,136 124.664,136 124.925,135.739 124.925,135.425 R109.2@125.85,134.5
PGEN: R59.1 U4.51 | length 2.1
  16_Bottom w0.25: R59.1@6.395,66.35 6.395,65.666 7,65.061 U4.51@7,64.5
PJEN: R74.1 U5.51 | length 2.8
  16_Bottom w0.25: U5.51@169.185,64.306 169.827,64.306 170.076,64.555 170.46,64.555 R74.1@171.435,65.53
PLL_1V8: C423.2 C424.2 C425.2 C426.2 C427.2 C428.2 C429.2 C430.2 C431.2 C432.2 C433.2 C434.2 C435.2 C436.2 C437.2 C438.2 C439.2 C440.2 C441.2 C442.2 C443.2 C444.2 L15.1 L16.1 Q4.1 Q4.2 Q4.3 R327.1 U1.AB14 U1.AC14 U1.AC16 U1.AC17 U1.AC19 U1.AC21 U1.AD27 U1.AE18 U1.AH27 U1.AM27 U1.D27 U1.H27 U1.M27 U1.T27 U1.U15 U1.U16 U1.U17 U1.U20 U1.U21 U1.U22 U1.W19 U1.Y27 | length 34
  1_Top w0.2: v1(88.675,77.475) 89.194,76.956 U1.Y27@89.194,76.939 ; v1(88.7,80.45) 88.705,80.45 U1.T27@89.194,80.939
  1_Top w0.254: v1(88.7,65.4) 88.733,65.4 U1.AM27@89.194,64.939 ; v1(88.7,73.3) v1@88.7,73.366 ; v1@88.7,73.367 89.127,72.939 U1.AD27@89.194,72.939 ; v1(88.7,88.5) 89.139,88.939 U1.H27@89.194,88.939 ; v1(88.7,93.4) 88.733,93.4 U1.D27@89.194,92.939 ; U1.M27@89.194,84.939 89.239,84.939 v1(89.7,85.4)
  1_Top w0.3: v1(75.679,74.279) 75.746,74.279 76.086,73.939 U1.AC14@76.194,73.939 ; v1(75.704,75.354) 75.746,75.354 76.161,74.939 U1.AB14@76.194,74.939 ; v1(76.725,80.45) 77.194,79.981 U1.U15@77.194,79.939 ; v1(77.725,74.375) 78.161,73.939 U1.AC16@78.194,73.939 ; v1(77.725,80.425) 77.725,80.408 U1.U16@78.194,79.939 ; v1(78.675,74.4) 79.136,73.939 U1.AC17@79.194,73.939 ; v1(78.7,80.375) 79.136,79.939 U1.U17@79.194,79.939 ; v1(79.675,72.45) 80.186,71.939 U1.AE18@80.194,71.939 ; v1(80.7,74.45) 80.7,74.433 U1.AC19@81.194,73.939 ; v1(80.7,78.425) 81.186,77.939 U1.W19@81.194,77.939 ; v1(81.675,80.4) 82.136,79.939 U1.U20@82.194,79.939 ; v1(82.7,74.4) 82.733,74.4 U1.AC21@83.194,73.939 ; v1(82.725,80.425) 82.725,80.408 U1.U21@83.194,79.939 ; v1(83.7,80.375) 84.136,79.939 U1.U22@84.194,79.939 ; v1(88.76,69.373) U1.AH27@89.194,68.939
  16_Bottom w0.2: v1(88.7,65.4) 88.96,65.14 C444.2@88.96,64.9 ; v1(88.7,80.45) 89.01,80.76 C443.2@89.225,80.76 ; v1(88.7,88.5) 88.95,88.75 C431.2@89.22,88.75 ; v1(88.7,93.4) 88.96,93.14 C442.2@88.96,92.9 ; v1(88.76,69.373) 88.827,69.373 89.2,69 C425.2@89.2,68.76 ; C432.2@89.06,84.9 89.2,84.9 v1(89.7,85.4)
  16_Bottom w0.3: v1(75.679,74.279) 75.679,73.861 C428.2@75.69,73.85 ; C426.2@75.69,74.875 75.704,74.889 v1(75.704,75.354) ; v1(75.8,84.425) 76.025,84.2 R327.1@76.025,83.8 ; C440.2@76.715,79.95 76.725,79.96 v1(76.725,80.45) ; C430.2@77.665,73.95 77.665,74.315 v1(77.725,74.375) ; v1(77.725,80.425) 77.725,79.965 C427.2@77.74,79.95 ; v1(78.675,74.4) 78.69,74.385 C429.2@78.69,73.975 ; v1(78.7,80.375) 78.815,80.26 C438.2@78.815,79.9 ; v1(79.675,72.45) 79.69,72.435 C434.2@79.69,71.95 ; v1(80.7,74.45) 80.7,74.14 C437.2@80.865,73.975 ; v1(80.7,78.425) 80.7,77.99 C441.2@80.74,77.95 ; L16.1@81.15,85.6 81.6,85.6 v1(81.775,85.425) ; v1(81.675,80.4) 81.79,80.515 C439.2@81.79,80.925 ; v1(82.7,74.4) 82.934,74.166 C424.2@82.934,73.994 ; v1(82.725,80.425) 82.725,80.211 83.021,79.915 C435.2@83.2,79.915 ; C424.2@82.89,73.95 C424.2@82.934,73.994 ; C424.2@82.934,73.939 C424.2@82.934,73.994 ; v1(83.7,80.375) 83.7,80.211 84.021,79.89 C436.2@84.2,79.89 ; v1(88.675,77.475) 88.675,77.425 89.225,76.875 C433.2@89.225,76.71 ; v3(120.475,104.75) 120.5,104.775 C423.2@122.025,104.775 C423.2@122.05,104.775 ; L15.1@122.025,103.3 122.05,103.325 C423.2@122.05,104.775 ; v3(123.55,104.775) C423.2@122.05,104.775
  other v3: 131.06,106.39 133.08,106.42 132.09,106.43 131.08,107.46 132.05,107.45 133.1,107.49 131.08,108.51 132.1,108.52 133.1,108.55
PMBUS_ALTERTN: R161.1 U10.E5 U23.E5 | length 71.6
  1_Top w0.25: v3(138.9,143.1) 138.9,142.99 U23.E5@139.495,142.395
  1_Top w0.254: U10.E5@144.535,81.1 145.14,80.495 v3(145.09,80.495)
  5_int4_(sign) w0.15: v3(138.9,143.1) 138.21,142.41 138.21,129.42 134.38,125.59 134.38,103.84 135.29,102.93 135.29,97.65 144.49,88.45 144.49,81.195 145.09,80.595 v3(145.09,80.495)
  16_Bottom w0.25: v3(138.9,143.1) 139.05,142.95 R161.1@139.05,142.3
PMBUS_SCL_3V3: R159.1 U10.E6 U23.E6 | length 76.4
  1_Top w0.25: U23.E6@139.495,143.665 140.075,144.245 v3(140.075,144.362)
  1_Top w0.254: U10.E6@145.805,81.1 145.805,81.08 146.29,80.595 v3(146.39,80.595)
  5_int4_(sign) w0.15: v3(140.075,144.362) 140.705,143.732 140.705,128.105 135.18,122.58 135.18,111.46 138.11,108.53 138.11,102.76 139.33,101.54 142.71,101.54 143.72,100.53 143.72,92.09 146.87,88.94 146.87,83.5 146.39,83.02 v3(146.39,80.595)
  16_Bottom w0.25: R159.1@138.95,144.1 139.9,144.1 140.1,144.3 140.075,144.325 v3(140.075,144.362)
PMBUS_SDA_3V3: R160.1 U10.D6 U23.D6 | length 73.7
  1_Top w0.25: v3(137.62,143.06) U23.D6@138.225,143.665
  1_Top w0.254: v3(145.19,82.995) 145.29,82.995 145.578,82.708 145.578,82.633 145.64,82.57 145.64,82.535 U10.D6@145.805,82.37
  5_int4_(sign) w0.15: v3(137.62,143.06) 137.62,143.645 137.95,143.975 139.425,143.975 139.8,143.6 139.8,142.7 139.5,142.4 139.5,136.85 138.78,136.13 138.78,127.51 134.76,123.49 134.76,104.844 135.81,103.794 135.81,98.06 146.24,87.63 146.24,84.045 v3(145.19,82.995)
  16_Bottom w0.25: R160.1@136.82,143.57 137.11,143.57 v3(137.62,143.06)
PPEN: R87.2 U6.27 | length 1.7
  16_Bottom w0.25: U6.27@11.225,85.25 11.65,85.25 12.5,86.1 R87.2@12.6,86.1
REFCLK0_FMCB_C_N: C520.1 U27.14 | length 1
  1_Top w0.1: U27.14@63.2,129.35 C520.1@63.2,130.3
REFCLK0_FMCB_C_P: C521.1 U27.13 | length 1.1
  1_Top w0.1: U27.13@63.7,129.35 63.7,129.795 64,130.095 C521.1@64,130.3
REFCLK0_FMCB_N: C520.2 U1.AL28 | length 87.2
  1_Top w0.1: C520.2@63.2,131.3 63.2,131.31 63.3,131.41 63.3,131.59 63.2,131.69 v2(63.2,131.8) ; U1.AL28@90.194,65.939 90.261,65.939 90.73,65.47 90.71,65.45 v1(90.71,65.37)
  10_int9_(sign) w0.09: v2(63.2,131.8) 63.46,131.54 63.46,130.326 63.986,129.8 67.761,129.8 68.701,128.86 68.74,128.86 86.33,111.27 86.33,100.099 86.305,100.074 86.305,100.02 85.9,99.614 85.9,96.273 86.1,96.073 86.1,90.764 85.01,89.674 85.01,85.826 86.936,83.9 90.46,83.9 91.11,83.25 91.11,82.015 93.05,80.075 93.05,78.164 91.55,76.664 91.55,72.525 92.075,72 92.075,67.714 91.03,66.669 91.03,65.83 90.71,65.51 v1(90.71,65.37)
REFCLK0_FMCB_P: C521.2 U1.AL29 | length 87
  1_Top w0.1: v2(63.91,131.8) 63.91,131.39 C521.2@64,131.3 ; U1.AL29@91.194,65.939 91.63,65.503 v1(91.63,65.37)
  10_int9_(sign) w0.09: v2(63.91,131.8) 63.7,131.59 63.7,130.425 64.085,130.04 67.86,130.04 68.8,129.1 68.839,129.1 86.57,111.369 86.57,100 86.545,99.975 86.545,99.92 86.14,99.515 86.14,96.372 86.34,96.172 86.34,90.665 85.25,89.575 85.25,85.925 87.035,84.14 90.559,84.14 91.35,83.349 91.35,82.114 93.29,80.174 93.29,78.065 91.79,76.565 91.79,72.624 92.315,72.099 92.315,67.615 91.27,66.57 91.27,65.83 91.63,65.47 v1(91.63,65.37)
REFCLK1_FMCB_C_N: C522.1 U27.10 | length 1
  1_Top w0.1: U27.10@64.4,127.65 64.995,127.65 65.145,127.8 C522.1@65.35,127.8
REFCLK1_FMCB_C_P: C523.1 U27.9 | length 1
  1_Top w0.1: U27.9@64.4,127.15 64.995,127.15 65.145,127 C523.1@65.35,127
REFCLK1_FMCB_N: C522.2 U1.U28 | length 64.8
  1_Top w0.1: C522.2@66.35,127.8 66.56,127.8 66.85,127.51 67.41,127.51 67.3,127.62 v3(67.3,127.7) ; v1(89.7,80.4) 89.8,80.4 90.194,80.006 U1.U28@90.194,79.939
  10_int9_(sign) w0.09: v3(67.3,127.7) 67.3,127.64 67,127.34 66.701,127.34 66.36,126.999 66.36,126.051 72.511,119.9 75.5,119.9 83.5,111.9 83.5,96.36 84.085,95.775 84.085,82.116 84.376,81.825 86.447,81.825 86.458,81.815 86.942,81.815 86.952,81.825 89.663,81.825 90.08,81.408 90.08,80.78 v1(89.7,80.4)
REFCLK1_FMCB_P: C523.2 U1.U29 | length 64.6
  1_Top w0.1: C523.2@66.35,127 66.56,127 66.74,127.18 67.21,127.18 v3@67.4,126.99 ; v3(67.3,126.8) 67.3,126.89 v3@67.4,126.99 ; v3@67.5,126.89 v3@67.4,126.99 ; v1(90.7,80.4) 90.7,80.433 U1.U29@91.194,79.939
  10_int9_(sign) w0.09: v3(67.3,126.8) 67,127.1 66.8,127.1 66.6,126.9 66.6,126.15 72.61,120.14 75.599,120.14 83.74,111.999 83.74,96.459 84.325,95.874 84.325,82.215 84.475,82.065 86.547,82.065 86.557,82.055 86.843,82.055 86.853,82.065 89.762,82.065 90.32,81.507 90.32,80.78 v1(90.7,80.4)
REFCLK_DP_C_N: C518.1 U27.18 | length 1
  1_Top w0.1: C518.1@60.9,130.2 61,130.2 61.2,130 U27.18@61.2,129.35
REFCLK_DP_C_P: C519.1 U27.17 | length 0.9
  1_Top w0.1: U27.17@61.7,129.35 C519.1@61.7,130.2
REFCLK_DP_N: C518.2 U1.G28 | length 61.2
  1_Top w0.1: C518.2@60.9,131.2 v2@60.9,131.6 ; v1(89.7,89.45) 89.7,89.5 90.139,89.939 U1.G28@90.194,89.939 ; v2@60.9,131.6 v2(60.9,131.7) 60.8,131.7 v2@60.9,131.6
  12_int11_(sign) w0.09: v2(60.9,131.7) 60.96,131.7 61.16,131.5 61.16,131.001 61.641,130.52 70.28,130.52 90.16,110.64 90.16,95.687 90.115,95.642 90.115,95.157 90.16,95.112 90.16,94.637 90.145,94.622 90.145,94.137 90.16,94.122 90.16,92.587 90.11,92.537 90.11,91.511 90.145,91.476 90.145,91.19 90.135,91.18 90.135,89.855 89.73,89.45 v1(89.7,89.45)
REFCLK_DP_P: C519.2 U1.G29 | length 61.2
  1_Top w0.1: C519.2@61.7,131.2 v2(61.7,131.7) ; v1(90.7,89.45) 90.7,89.5 91.139,89.939 U1.G29@91.194,89.939 ; v2(61.7,131.7) 61.7,131.78 61.62,131.7 v2(61.7,131.7)
  12_int11_(sign) w0.09: v2(61.7,131.7) 61.6,131.7 61.4,131.5 61.4,131.1 61.74,130.76 70.379,130.76 90.4,110.739 90.4,95.588 90.355,95.543 90.355,95.257 90.4,95.212 90.4,94.538 90.385,94.523 90.385,94.237 90.4,94.222 90.4,92.488 90.35,92.438 90.35,91.611 90.385,91.576 90.385,91.091 90.375,91.081 90.375,89.745 90.67,89.45 v1(90.7,89.45)
REFCLK_SDI_N: C545.1 U1.E28 | length 24.1
  1_Top w0.1: C545.1@89.1,113.5 89.6,114 v3(89.6,114.1) ; U1.E28@90.194,91.939 90.239,91.939 90.6,92.3 v1(90.7,92.3)
  10_int9_(sign) w0.09: v3(89.6,114.1) 90,113.7 90,101.31 91.1,100.21 91.1,95.273 91.21,95.163 91.21,93.055 91.03,92.874 91.03,92.63 v1(90.7,92.3)
REFCLK_SDI_P: C544.1 U1.E29 | length 24
  1_Top w0.1: v3(90.5,114.1) 90.5,113.9 C544.1@90.9,113.5 ; U1.E29@91.194,91.994 U1.E29@91.194,91.939 91.6,92.345 v1(91.6,92.4)
  10_int9_(sign) w0.09: v3(90.5,114.1) 90.24,113.84 90.24,101.409 91.34,100.309 91.34,95.372 91.45,95.262 91.45,92.955 91.27,92.775 91.27,92.73 v1(91.6,92.4)
REFCLK_SMA_N: C524.1 U1.J28 U28.10 | length 69.9
  1_Top w0.1: C524.1@50.4,126.1 50.4,126.275 50.425,126.3 v2(51,126.3) 51.06,126.3 51.3,126.54 51.71,126.54 51.85,126.4 U28.10@52.3,126.4 ; v1(89.8,87.5) 89.8,87.545 U1.J28@90.194,87.939
  12_int11_(sign) w0.09: v2(51,126.3) 51.3,126.6 52.1,126.6 52.86,125.84 52.86,123.001 54.161,121.7 68.6,121.7 84.815,105.485 84.815,95.873 85.045,95.643 85.045,95.357 84.815,95.127 84.815,90.131 86.101,88.845 89.855,88.845 90.125,88.575 90.125,87.745 89.88,87.5 v1(89.8,87.5)
REFCLK_SMA_P: C531.1 U1.J29 U28.9 | length 70.1
  1_Top w0.1: C531.1@50.525,127.225 50.775,127.225 v2(51,127) 51.06,127 51.3,126.76 51.71,126.76 51.85,126.9 U28.9@52.3,126.9 ; v1(90.8,87.5) 90.8,87.545 U1.J29@91.194,87.939
  12_int11_(sign) w0.09: v2(51,127) 51.16,126.84 52.199,126.84 53.1,125.939 53.1,123.1 54.26,121.94 68.699,121.94 85.055,105.584 85.055,95.972 85.285,95.742 85.285,95.257 85.055,95.028 85.055,90.23 86.2,89.085 89.99,89.085 90.387,88.688 90.38,88.68 90.38,87.84 90.72,87.5 v1(90.8,87.5)
"SENSESYNC_  1": R147.1 U10.E7 | length 1.7
  1_Top w0.3: U10.E7@147.075,81.1 147.135,81.1 v3(147.64,81.605)
  16_Bottom w0.3: R147.1@146.79,81.445 147.48,81.445 v3(147.64,81.605)
"SENSESYNC_  2": R164.1 U23.E7 | length 1.9
  1_Top w0.254: v3(138.857,145.682) 138.857,145.573 U23.E7@139.495,144.935
  16_Bottom w0.254: v3(138.857,145.682) 138.857,145.643 139.25,145.25 R164.1@139.25,144.925
SFPA_RX_N: J7.12 U1.AU32 | length 65.9
  1_Top w0.1: U1.AU32@94.194,59.939 94.194,59.906 v7(94.7,59.4) ; J7.12@141.3,44.15 J7.12@141.4,44.05 141.4,45.35 v7(141.4,45.4)
  12_int11_(sign) w0.09: v7(94.7,59.4) ccw(c94.7,59.593) 94.837,59.457 95.08,59.7 cw(c95.32,59.7) 95.15,59.87 95.34,60.06 cw(c95.51,59.89) 95.51,60.13 95.883,60.13 cw(c95.883,59.583) 96.27,59.97 cw(c95.134,58.834) 96.74,58.834 96.74,50.028 ccw(c97.628,50.028) 97,49.4 101.556,44.844 ccw(c103.352,46.64) 103.352,44.1 120.434,44.1 ccw(c120.434,45.466) 121.4,44.5 125.686,48.786 cw(c127.652,46.82) 127.652,49.6 137.088,49.6 cw(c137.088,46.82) 139.054,48.786 140.94,46.899 cw(c140.626,46.586) 141.07,46.586 141.07,45.5 ccw(c141.311,45.741) 141.311,45.4 v7(141.4,45.4)
SFPA_RX_P: J7.13 U1.AU33 | length 65.5
  1_Top w0.1: U1.AU33@95.194,59.939 95.194,59.906 v7(95.7,59.4) ; J7.13@140.6,44.05 140.5,44.15 v7(140.5,45.4) 140.625,45.4 v7@140.65,45.425
  12_int11_(sign) w0.09: v7(95.7,59.4) 95.6,59.3 95.375,59.3 95.32,59.355 95.32,59.7 95.51,59.89 95.883,59.89 cw(c95.883,59.583) 96.1,59.8 cw(c95.134,58.834) 96.5,58.834 96.5,50.028 ccw(c97.628,50.028) 96.83,49.23 101.386,44.674 ccw(c103.352,46.64) 103.352,43.86 120.534,43.86 ccw(c120.534,45.226) 121.499,44.26 125.855,48.616 cw(c127.652,46.82) 127.652,49.36 137.088,49.36 cw(c137.088,46.82) 138.884,48.616 140.7,46.8 cw(c140.386,46.486) 140.83,46.486 140.83,45.5 140.73,45.4 v7(140.5,45.4)
SFPA_TX_N: J7.19 U1.AW32 | length 60.1
  1_Top w0.1: v7(93.7,58.433) U1.AW32@94.194,57.939 U1.AW32@94.194,58.006 ; v7(135.725,45.4) cw(c135.544,45.219) 135.8,45.219 J7.19@135.8,44.05
  12_int11_(sign) w0.09: v7(93.7,58.433) cw(c93.7,58.369) 93.745,58.415 94.06,58.1 94.06,50.752 ccw(c96.84,50.752) 94.874,48.786 100.186,43.474 ccw(c102.152,45.44) 102.152,42.66 120.808,42.66 ccw(c120.808,45.44) 122.774,43.474 126.656,47.356 cw(c128.452,45.56) 128.452,48.1 134.493,48.1 cw(c134.493,46.393) 135.7,47.6 135.8,47.5 cw(c135.124,46.824) 136.08,46.824 136.08,45.774 cw(c135.551,45.774) 135.925,45.4 v7(135.725,45.4)
SFPA_TX_P: J7.18 U1.AW33 | length 60
  1_Top w0.1: v7(94.725,58.425) 94.708,58.425 94.717,58.417 U1.AW33@95.194,57.939 ; J7.18@136.6,44.05 136.6,45.1 v7(136.6,45.4)
  12_int11_(sign) w0.09: v7(94.725,58.425) ccw(c94.725,58.184) 94.554,58.354 94.3,58.1 94.3,50.752 ccw(c96.84,50.752) 95.044,48.956 100.356,43.644 ccw(c102.152,45.44) 102.152,42.9 120.808,42.9 ccw(c120.808,45.44) 122.605,43.644 126.486,47.526 cw(c128.452,45.56) 128.452,48.34 134.493,48.34 cw(c134.493,46.393) 135.87,47.77 136.04,47.599 cw(c135.364,46.923) 136.32,46.923 136.32,45.774 ccw(c136.849,45.774) 136.475,45.4 v7(136.6,45.4)
SFPA_VCCR: C553.2 C554.2 J7.15 L24.2 | length 5.7
  1_Top w0.3: v3(138.9,42.4) 139,42.5 J7.15@139,44.05
  16_Bottom w0.3: v3(138.9,42.4) C553.2@139.5,42.4 ; C554.2@139.425,43.8 139.6,43.625 139.6,42.5 C553.2@139.5,42.4 ; L24.2@140.3,41.145 139.815,41.145 139.6,41.36 C553.2@139.6,42.4 C553.2@139.5,42.4
SFPA_VCCT: C550.2 J7.16 L23.2 | length 3.7
  1_Top w0.3: v3(137.8,42.4) 138.2,42.8 J7.16@138.2,44.05
  16_Bottom w0.3: L23.2@137.1,41.145 137.2,41.245 C550.2@137.2,42.4 v3(137.8,42.4)
SFPB_RX_N: J21.12 U1.AT30 | length 87.9
  1_Top w0.1: U1.AT30@92.194,60.939 92.194,60.906 v7(92.7,60.4) ; J21.12@160.7,44.05 v7(160.7,45.425)
  12_int11_(sign) w0.09: v7(92.7,60.4) 92.997,60.4 93.097,60.5 93.097,60.736 93.4,61.039 ; 93.4,61.04 98.817,61.04 cw(c98.817,60.117) 99.47,60.77 101.806,58.433 cw(c100.373,57) 102.4,57 102.4,49.352 ccw(c104.94,49.352) 103.144,47.556 103.556,47.144 ccw(c105.352,48.94) 105.352,46.4 117.508,46.4 ccw(c117.508,48.94) 119.305,47.144 124.357,52.196 cw(c126.153,50.4) 126.153,52.94 153.544,52.94 cw(c153.544,51.165) 154.799,52.42 160.138,47.082 cw(c159.456,46.4) 160.42,46.4 160.42,46.099 ccw(c161.372,46.099) 160.699,45.426 v7(160.7,45.425)
SFPB_RX_P: J21.13 U1.AT31 | length 87.5
  1_Top w0.1: U1.AT31@93.194,60.939 v7(93.733,60.4) ; v7(159.825,45.4) 159.825,44.125 J21.13@159.9,44.05
  12_int11_(sign) w0.09: v7(93.733,60.4) 93.733,60.283 93.65,60.2 93.475,60.2 93.337,60.338 93.337,60.637 93.5,60.8 98.817,60.8 cw(c98.817,60.117) 99.3,60.6 ; 99.3,60.6 101.637,58.263 cw(c100.373,57) 102.16,57 102.16,49.352 ccw(c104.94,49.352) 102.974,47.386 103.386,46.974 ccw(c105.352,48.94) 105.352,46.16 117.508,46.16 ccw(c117.508,48.94) 119.474,46.974 124.386,51.886 cw(c126.352,49.92) 124.387,51.887 cw(c126.352,49.92) 126.352,52.7 153.445,52.7 cw(c153.445,50.925) 154.7,52.18 159.968,46.912 cw(c159.456,46.4) 160.18,46.4 160.18,46 cw(c159.589,46) 160.007,45.582 v7(159.825,45.4)
SFPB_TX_N: J21.19 U1.AW36 | length 75.5
  1_Top w0.1: v7(97.675,58.458) U1.AW36@98.194,57.939 ; J21.19@155.1,44.05 v7(155.1,45.4)
  12_int11_(sign) w0.09: v7(97.675,58.458) cw(c97.675,58.153) 97.891,58.369 98.06,58.2 98.06,51.252 ccw(c100.84,51.252) 98.874,49.286 102.286,45.874 ccw(c104.252,47.84) 104.252,45.06 118.908,45.06 ccw(c118.908,47.84) 120.874,45.874 125.356,50.356 cw(c127.152,48.56) 127.152,51.1 150.525,51.1 cw(c150.525,48.56) 152.321,50.356 153.99,48.687 cw(c152.248,46.52) 154.214,48.486 154.7,48 cw(c153.058,46.358) 155.38,46.358 155.38,45.799 cw(c154.851,45.799) 155.225,45.425 155.2,45.4 v7(155.1,45.4)
SFPB_TX_P: J21.18 U1.AW37 | length 75.5
  1_Top w0.1: v7(98.7,58.433) U1.AW37@99.194,57.939 ; J21.18@155.9,44.05 v7(155.9,45.4)
  12_int11_(sign) w0.09: v7(98.7,58.433) ccw(c98.7,58.031) 98.416,58.316 98.3,58.2 98.3,51.252 ccw(c100.84,51.252) 99.044,49.456 102.456,46.044 ccw(c104.252,47.84) 104.252,45.3 118.908,45.3 ccw(c118.908,47.84) 120.705,46.044 125.186,50.526 cw(c127.152,48.56) 127.152,51.34 150.525,51.34 cw(c150.525,48.56) 152.491,50.526 154.028,48.988 cw(c152.447,47) 154.243,48.796 154.876,48.163 cw(c153.08,46.367) 155.62,46.367 155.62,45.799 ccw(c156.149,45.799) 155.775,45.425 155.8,45.4 v7(155.9,45.4)
SFPB_VCCR: C558.2 C559.2 J21.15 L26.2 | length 5.6
  1_Top w0.3: J21.15@158.3,44.05 158.3,42.4 158.5,42.2 v3(158.6,42.3)
  16_Bottom w0.3: v3(158.6,42.3) 158.7,42.2 C558.2@159.5,42.2 ; C559.2@159.525,43.6 159.525,42.225 C558.2@159.5,42.2 ; L26.2@159.7,41.145 159.5,41.345 C558.2@159.5,42.2
SFPB_VCCT: C556.2 J21.16 L25.2 | length 3.6
  1_Top w0.3: v3(157.5,42.3) J21.16@157.5,44.05
  16_Bottom w0.3: L25.2@156.5,41.145 156.9,41.545 C556.2@156.9,42.2 157.4,42.2 v3(157.5,42.3)
SHARE_CLK1: R148.1 U10.H7 | length 1.9
  1_Top w0.3: v3(146.44,76.655) U10.H7@147.075,77.29
  16_Bottom w0.25: v3(146.44,76.655) 146.63,76.845 R148.1@147.365,76.845
SHARE_CLK2: R165.1 U23.H7 | length 1.9
  1_Top w0.3: U23.H7@143.305,144.935 v3(143.94,144.3)
  16_Bottom w0.25: R165.1@143.75,145.225 143.75,144.49 v3(143.94,144.3)
TRD1_N: J11.3 U11.3 | length 8.1
  1_Top w0.1: J11.3@19.08,19.794 18.32,20.553 18.32,20.907 19.722,22.309 19.722,26.535 19.862,26.675 U11.3@19.862,26.975
TRD1_P: J11.1 U11.2 | length 8.3
  1_Top w0.1: J11.1@17.048,19.794 17.194,19.794 18.1,20.7 18.1,20.998 19.502,22.4 19.502,26.535 19.362,26.675 U11.2@19.362,26.975
TRD2_N: J11.6 U11.6 | length 15.3
  1_Top w0.1: J11.6@18.064,17.254 18.626,17.254 18.98,16.9 18.98,16.009 19.309,15.68 20.591,15.68 21.22,16.309 21.22,22.807 21.222,22.809 21.222,26.535 21.362,26.675 U11.6@21.362,26.975
TRD2_P: J11.4 U11.5 | length 14.6
  1_Top w0.1: J11.4@20.096,17.254 19.554,17.254 19.2,16.9 19.2,16.1 19.4,15.9 20.5,15.9 21,16.4 21,22.898 21.002,22.9 21.002,26.535 20.862,26.675 U11.5@20.862,26.975
TRD3_N: J11.9 U11.8 | length 10.8
  1_Top w0.1: U11.8@22.362,26.975 22.362,26.675 22.222,26.535 22.222,19.178 23.22,18.18 23.22,17.8 23.766,17.254 J11.9@24.16,17.254
TRD3_P: J11.7 U11.7 | length 10.7
  1_Top w0.1: U11.7@21.862,26.975 21.862,26.675 22.002,26.535 22.002,19.087 23,18.089 23,17.8 22.454,17.254 J11.7@22.128,17.254
TRD4_N: J11.12 U11.11 | length 13.2
  1_Top w0.1: J11.12@23.144,19.794 23.586,19.794 24.08,19.3 24.08,18.909 24.509,18.48 25.691,18.48 26.295,19.084 26.295,22.805 23.722,25.378 23.722,26.535 23.862,26.675 U11.11@23.862,26.975
TRD4_P: J11.10 U11.10 | length 12.4
  1_Top w0.1: U11.10@23.362,26.975 23.362,26.675 23.502,26.535 23.502,25.287 26.075,22.714 26.075,19.175 25.6,18.7 24.6,18.7 24.3,19 24.3,19.3 24.794,19.794 J11.10@25.176,19.794
USB3_BE0: U1.AU17 U33.4 | length 63.8
  1_Top w0.1: U1.AU17@79.194,59.939 79.8,59.333 79.8,56.2
  1_Top w0.17: 79.8,56.2 79.8,56 80,55.8 80,49.6 81,48.6 81,48.1 81,47.983 81.118,47.865 81.857,47.865 81.975,47.748 81.975,47.513 81.857,47.395 81,47.395 80.613,47.395 80.495,47.278 80.495,47.043 80.613,46.925 80.883,46.925 81,46.808 81,46.5 81.166,46.334 81.415,46.085 81.415,45.918 81.063,45.566 81.063,45.4 81.229,45.234 81.395,45.234 81.831,45.669 82.437,46.275 82.603,46.275 82.769,46.109 82.769,45.943 82.163,45.337 81.858,45.031 81.858,44.865 82.024,44.699 82.19,44.699 82.496,45.004 83.102,45.611 83.268,45.611 83.434,45.444 83.434,45.278 82.828,44.672 82.523,44.367 82.523,44.201 82.689,44.034 82.855,44.034 83.16,44.34 83.766,44.946 83.933,44.946 84.099,44.78 84.099,44.614 83.493,44.007 83.187,43.702 83.187,43.536 83.353,43.37 83.52,43.37 83.825,43.675 84.431,44.281 84.597,44.281 84.763,44.115 84.763,43.949 84.157,43.343 83.852,43.037 83.852,42.871 84.018,42.705 84.184,42.705 84.49,43.01 85.096,43.617 85.262,43.617 85.428,43.45 85.428,43.284 84.822,42.678 84.216,42.072 84.216,41.906 84.382,41.74 84.548,41.74 85.071,42.263 85.237,42.263 85.487,42.013 85.7,41.8 85.7,41.565 85.7,41.213 85.817,41.095 86.557,41.095 86.675,40.978 86.675,40.743 86.557,40.625 85.7,40.625 85.283,40.625 85.166,40.508 85.166,40.273 85.283,40.155 85.7,40.155 86.557,40.155 86.675,40.038 86.675,39.803 86.557,39.685 85.7,39.685 85.283,39.685 85.166,39.568 85.166,39.333 85.283,39.215 85.7,39.215 86.557,39.215 86.675,39.098 86.675,38.863 86.557,38.745 85.7,38.745 85.283,38.745 85.166,38.628 85.166,38.393 85.283,38.275 85.582,38.275 85.7,38.158 85.7,37.8 85.7,35.2 84.3,33.8 84.3,27.831 84.931,27.2 U33.4@85.925,27.2